# Altium PCB Switch_Matrix_32_2.PCBDOC (part 6 of 9)
Units mm, origin at the board's own origin, x right, y up, seen from the top; angles counter-clockwise.
Board outline 222.54 x 100 mm, 6 copper layers (L1, P2, L3, P4, L5, L6), stack 1.61 mm thick; 629 components, 583 nets, 2332 pads, 825 vias.
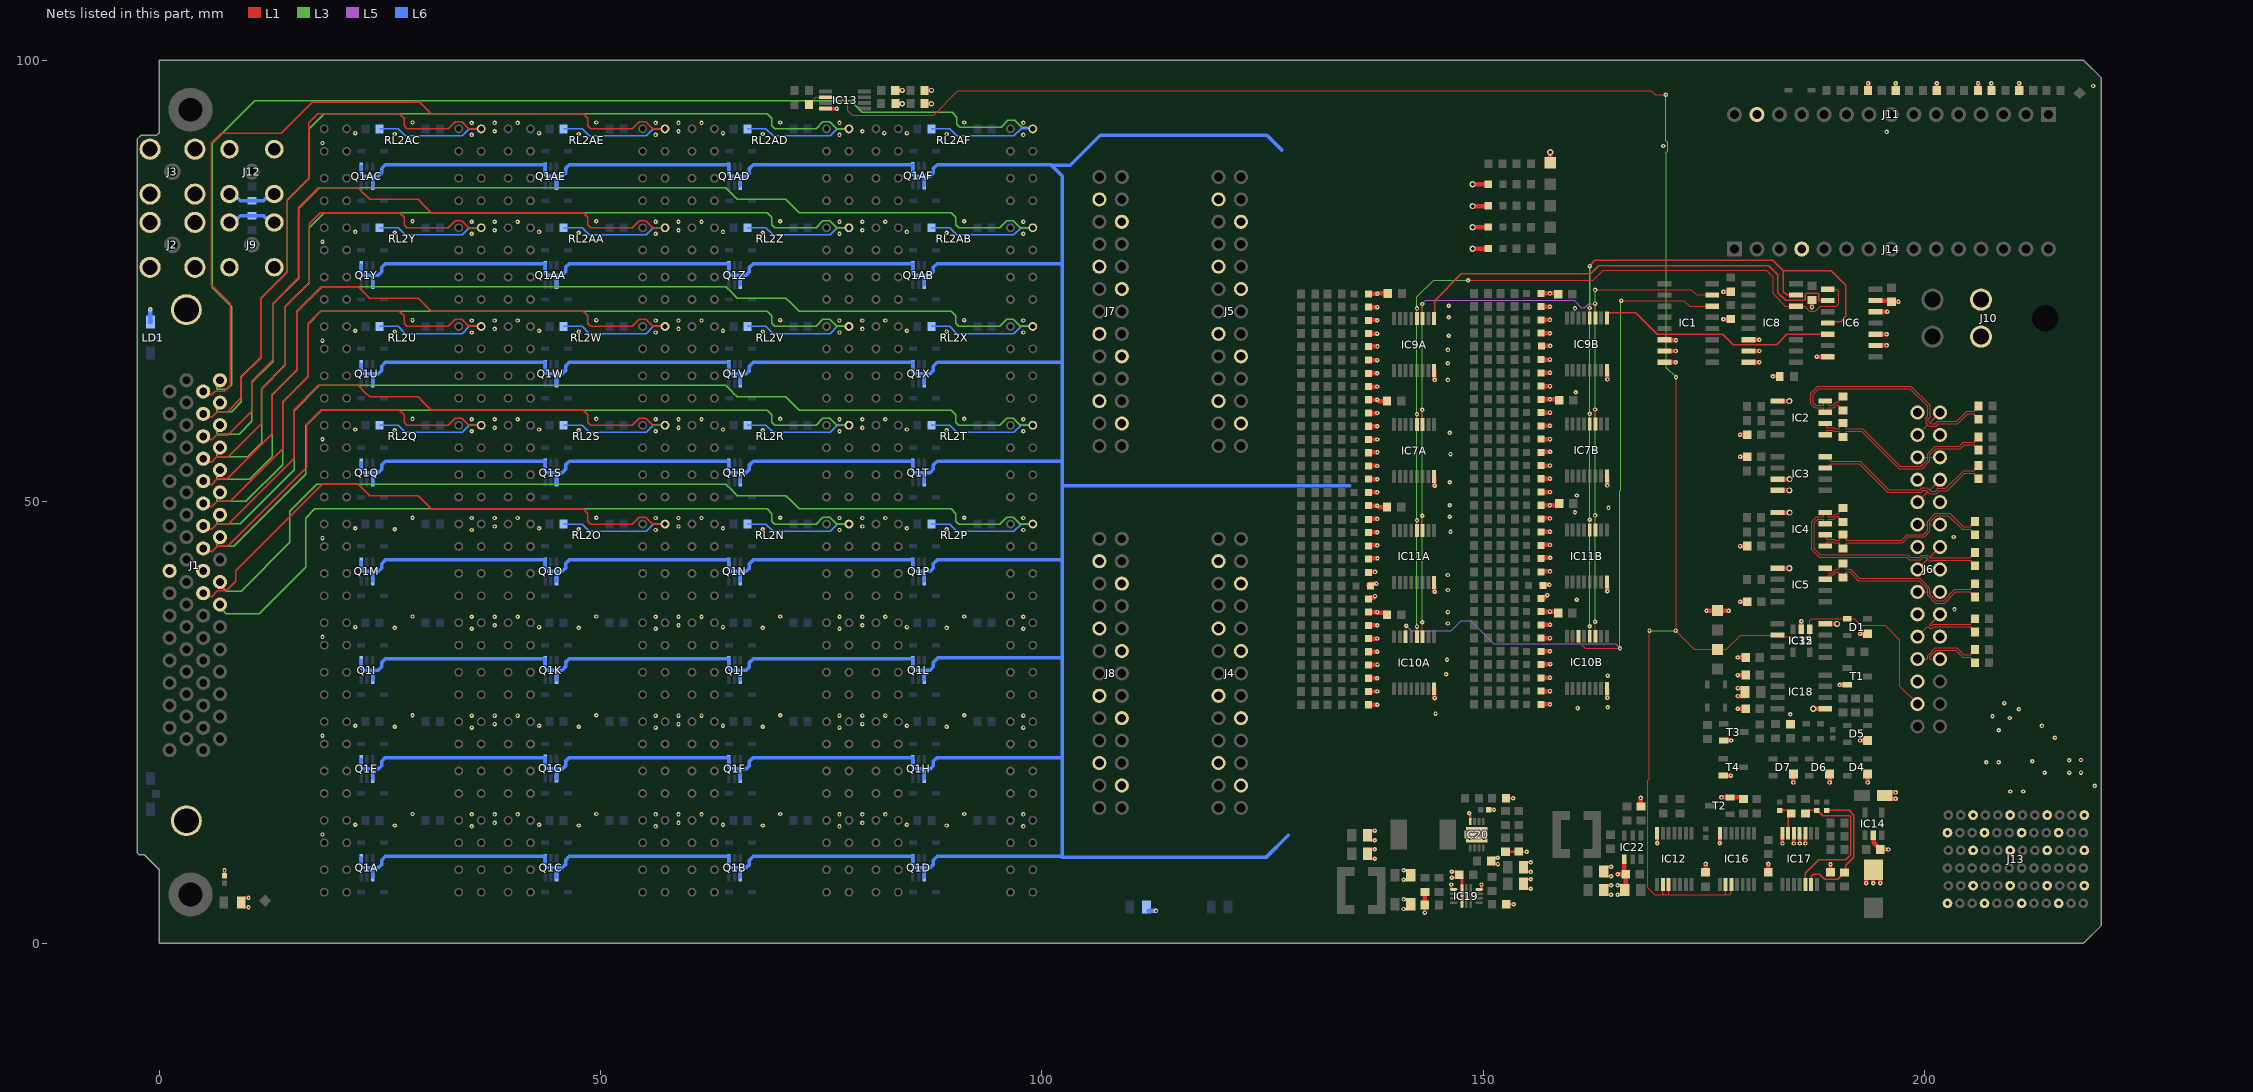
[diagram p9: the nets of this part, all layers, seen from the top]

## Via types
v1: diameter 0.5, hole 0.2, L1 to L6, tented both sides, 775 vias
v2: diameter 0.7, hole 0.4, L1 to L6, tented both sides, 41 vias
v3: diameter 0.5, hole 0.2, L1 to L6, 5 vias
v4: diameter 0.6, hole 0.3, L1 to L6, tented both sides, 4 vias

## Nets (pads, with @x,y where several pads share a name; then routed paths per layer and width w, separated by ;. In a path a pad name is that pad's centre, name@x,y a point inside that pad or via, vN(x,y) a via of type N, cw(c..) or ccw(c..) an arc to the next point about the centre after c; other vN are vias at no path point) (continued)
DAC_OUT_P14: J1.14 R98N.1 RL2N.5 | length 94
  L3 w0.152: J1.14@6.894,38.361 6.894,38.036 7.598,37.333 11.333,37.333 16.595,42.595 16.595,48.126 17.644,49.175 19.933,49.175 68.891,49.175 69.408,48.659 69.408,47.81 69.746,47.472 74.414,47.472 75.204,48.262 75.949,48.262 76.74,47.472 RL2N.5@78.146,47.472
  L6 w0.152: R98N.1@66.65,47.472 68.744,47.472 69.548,46.668 76.006,46.668 76.81,47.472 RL2N.5@78.146,47.472
DAC_OUT_P15: J1.15 R98O.1 RL2O.5 | length 73.6
  L1 w0.152: J1.15@4.989,39.631 5.381,39.631 5.767,39.245 5.929,39.245 6.582,39.898 7.581,39.898 8.689,41.006 8.689,42.207 18.462,51.981 22.529,51.981 23.226,51.284 23.334,51.176 23.829,50.681 29.329,50.681 29.926,50.084 30.034,49.976 30.835,49.175 48.055,49.175 48.572,48.659 48.572,47.81 48.91,47.472 53.578,47.472 54.368,48.262 55.113,48.262 55.904,47.472 RL2O.5@57.31,47.472
  L6 w0.152: R98O.1@45.814,47.472 47.908,47.472 48.712,46.668 55.17,46.668 55.974,47.472 RL2O.5@57.31,47.472
DAC_OUT_P16: J1.16 R98P.1 RL2P.5 | length 115
  L3 w0.152: J1.16@6.894,40.901 6.894,40.576 7.598,39.873 9.273,39.873 14.795,45.395 14.795,48.926 17.85,51.981 19.291,51.981 64.201,51.981 64.898,51.284 65.006,51.176 65.501,50.681 71.001,50.681 71.598,50.084 71.706,49.976 72.507,49.175 89.727,49.175 90.244,48.659 90.244,47.81 90.582,47.472 95.25,47.472 96.04,48.262 96.785,48.262 97.576,47.472 RL2P.5@98.982,47.472
  L6 w0.152: R98P.1@87.486,47.472 89.58,47.472 90.384,46.668 96.842,46.668 97.646,47.472 RL2P.5@98.982,47.472
DAC_OUT_P17: J1.19 R98Q.1 RL2Q.5 | length 55.1
  L1 w0.152: J1.19@4.989,44.711 5.381,44.711 5.767,44.325 5.929,44.325 6.582,44.978 7.779,44.978 16.695,53.894 16.695,58.726 18.336,60.367 27.219,60.367 27.736,59.851 27.736,59.002 28.074,58.664 32.742,58.664 33.532,59.454 34.277,59.454 35.068,58.664 RL2Q.5@36.474,58.664
  L6 w0.152: R98Q.1@24.978,58.664 27.072,58.664 27.876,57.86 34.334,57.86 35.138,58.664 RL2Q.5@36.474,58.664
DAC_OUT_P18: J1.20 R98R.1 RL2R.5 | length 96.4
  L3 w0.152: J1.20@6.894,45.981 6.894,45.59 6.509,45.204 6.509,45.042 6.598,44.953 8.453,44.953 16.595,53.095 16.595,58.626 18.336,60.367 20.827,60.367 68.891,60.367 69.408,59.851 69.408,59.002 69.746,58.664 74.414,58.664 75.204,59.454 75.949,59.454 76.74,58.664 RL2R.5@78.146,58.664
  L6 w0.152: R98R.1@66.65,58.664 68.744,58.664 69.548,57.86 76.006,57.86 76.81,58.664 RL2R.5@78.146,58.664
DAC_OUT_P19: J1.21 R98S.1 RL2S.5 | length 77.6
  L1 w0.152: J1.21@4.989,47.251 5.381,47.251 5.767,46.865 5.929,46.865 6.582,47.518 7.86,47.518 15.295,54.953 15.295,60.426 18.042,63.173 22.529,63.173 23.226,62.476 23.334,62.368 23.829,61.873 29.329,61.873 29.926,61.276 30.034,61.168 30.835,60.367 48.055,60.367 48.572,59.851 48.572,59.002 48.91,58.664 53.578,58.664 54.368,59.454 55.113,59.454 55.904,58.664 RL2S.5@57.31,58.664
  L6 w0.152: R98S.1@45.814,58.664 47.908,58.664 48.712,57.86 55.17,57.86 55.974,58.664 RL2S.5@57.31,58.664
DAC_OUT_P20: J1.22 R98T.1 RL2T.5 | length 119.2
  L3 w0.152: J1.22@6.894,48.521 6.894,48.13 6.509,47.744 6.509,47.582 6.598,47.493 9.193,47.493 15.295,53.595 15.295,60.326 18.142,63.173 19.543,63.173 64.201,63.173 64.898,62.476 65.006,62.368 65.501,61.873 71.001,61.873 71.598,61.276 71.706,61.168 72.507,60.367 89.727,60.367 90.244,59.851 90.244,59.002 90.582,58.664 95.25,58.664 96.04,59.454 96.785,59.454 97.576,58.664 RL2T.5@98.982,58.664
  L6 w0.152: R98T.1@87.486,58.664 89.58,58.664 90.384,57.86 96.842,57.86 97.646,58.664 RL2T.5@98.982,58.664
DAC_OUT_P21: J1.23 R98U.1 RL2U.5 | length 61.5
  L1 w0.152: J1.23@4.989,49.791 5.381,49.791 5.767,49.405 5.929,49.405 6.582,50.058 8.055,50.058 14.021,56.025 14.021,61.321 16.882,64.182 16.882,70.214 18.228,71.559 27.219,71.559 27.736,71.043 27.736,70.194 28.074,69.856 32.742,69.856 33.532,70.646 34.277,70.646 35.068,69.856 RL2U.5@36.474,69.856
  L6 w0.152: R98U.1@24.978,69.856 27.072,69.856 27.876,69.052 34.334,69.052 35.138,69.856 RL2U.5@36.474,69.856
DAC_OUT_P22: J1.24 R98V.1 RL2V.5 | length 103.3
  L3 w0.152: J1.24@6.894,51.061 6.894,50.67 6.509,50.284 6.509,50.122 6.598,50.033 9.833,50.033 13.995,54.195 13.995,61.295 16.895,64.195 16.895,70.126 18.328,71.559 18.924,71.559 68.891,71.559 69.408,71.043 69.408,70.194 69.746,69.856 74.414,69.856 75.204,70.646 75.949,70.646 76.74,69.856 RL2V.5@78.146,69.856
  L6 w0.152: R98V.1@66.65,69.856 68.744,69.856 69.548,69.052 76.006,69.052 76.81,69.856 RL2V.5@78.146,69.856
DAC_OUT_P23: J1.25 R98W.1 RL2W.5 | length 83.4
  L1 w0.152: J1.25@4.989,52.331 5.381,52.331 5.767,51.945 5.929,51.945 6.582,52.598 7.688,52.598 12.815,57.725 12.815,62.115 15.595,64.895 15.595,71.562 18.398,74.365 22.529,74.365 23.226,73.668 23.334,73.56 23.829,73.065 29.329,73.065 29.926,72.468 30.034,72.36 30.835,71.559 48.055,71.559 48.572,71.043 48.572,70.194 48.91,69.856 53.578,69.856 54.368,70.646 55.113,70.646 55.904,69.856 RL2W.5@57.31,69.856
  L6 w0.152: R98W.1@45.814,69.856 47.908,69.856 48.712,69.052 55.17,69.052 55.974,69.856 RL2W.5@57.31,69.856
DAC_OUT_P24: J1.26 R98X.1 RL2X.5 | length 125.8
  L3 w0.152: J1.26@6.894,53.601 6.894,53.21 6.509,52.824 6.509,52.662 6.598,52.573 10.273,52.573 12.795,55.095 12.795,62.095 15.595,64.895 15.595,71.526 18.434,74.365 19.268,74.365 64.201,74.365 64.898,73.668 65.006,73.56 65.501,73.065 71.001,73.065 71.598,72.468 71.706,72.36 72.507,71.559 89.727,71.559 90.244,71.043 90.244,70.194 90.582,69.856 95.25,69.856 96.04,70.646 96.785,70.646 97.576,69.856 RL2X.5@98.982,69.856
  L6 w0.152: R98X.1@87.486,69.856 89.58,69.856 90.384,69.052 96.842,69.052 97.646,69.856 RL2X.5@98.982,69.856
DAC_OUT_P25: J1.27 R98Y.1 RL2Y.5 | length 67.5
  L1 w0.152: J1.27@4.989,54.871 5.381,54.871 5.767,54.485 5.929,54.485 6.543,55.1 7.808,55.1 11.569,58.861 11.569,62.769 14.295,65.495 14.295,72.135 16.972,74.812 16.972,81.503 18.22,82.751 27.219,82.751 27.736,82.235 27.736,81.386 28.074,81.048 32.742,81.048 33.532,81.838 34.277,81.838 35.068,81.048 RL2Y.5@36.474,81.048
  L6 w0.152: R98Y.1@24.978,81.048 27.072,81.048 27.876,80.244 34.334,80.244 35.138,81.048 RL2Y.5@36.474,81.048
DAC_OUT_P26: J1.28 R98Z.1 RL2Z.5 | length 109.3
  L3 w0.152: J1.28@6.894,56.141 6.894,55.75 6.509,55.364 6.509,55.202 6.598,55.113 10.013,55.113 11.595,56.695 11.595,62.795 14.295,65.495 14.295,72.095 16.984,74.784 16.984,81.015 18.72,82.751 20.1,82.751 68.891,82.751 69.408,82.235 69.408,81.386 69.746,81.048 74.414,81.048 75.204,81.838 75.949,81.838 76.74,81.048 RL2Z.5@78.146,81.048
  L6 w0.152: R98Z.1@66.65,81.048 68.744,81.048 69.548,80.244 76.006,80.244 76.81,81.048 RL2Z.5@78.146,81.048
DAC_OUT_P27: J1.29 R98AA.1 RL2AA.5 | length 89.9
  L1 w0.152: J1.29@4.989,57.411 5.381,57.411 5.767,57.025 5.929,57.025 6.448,57.545 7.75,57.545 10.458,60.253 10.458,63.658 12.895,66.095 12.895,72.5 15.758,75.363 15.758,83.289 18.026,85.557 22.529,85.557 23.226,84.86 23.334,84.752 23.829,84.257 29.329,84.257 29.926,83.66 30.034,83.552 30.835,82.751 48.055,82.751 48.572,82.235 48.572,81.386 48.91,81.048 53.578,81.048 54.368,81.838 55.113,81.838 55.904,81.048 RL2AA.5@57.31,81.048
  L6 w0.152: R98AA.1@45.814,81.048 47.908,81.048 48.712,80.244 55.17,80.244 55.974,81.048 RL2AA.5@57.31,81.048
DAC_OUT_P28: J1.30 R98AB.1 RL2AB.5 | length 131.4
  L3 w0.152: J1.30@6.894,58.681 6.894,58.29 6.509,57.904 6.509,57.742 6.598,57.653 9.053,57.653 10.5,59.1 10.5,63.531 12.9,65.931 12.9,72.431 15.8,75.331 15.8,83.231 18.126,85.557 20.591,85.557 64.201,85.557 64.898,84.86 65.006,84.752 65.501,84.257 71.001,84.257 71.598,83.66 71.706,83.552 72.507,82.751 89.727,82.751 90.244,82.235 90.244,81.386 90.582,81.048 95.25,81.048 96.04,81.838 96.785,81.838 97.576,81.048 RL2AB.5@98.982,81.048
  L6 w0.152: R98AB.1@87.486,81.048 89.58,81.048 90.384,80.244 96.842,80.244 97.646,81.048 RL2AB.5@98.982,81.048
DAC_OUT_P29: J1.31 R98AC.1 RL2AC.5 | length 73.7
  L1 w0.152: J1.31@4.989,59.951 5.381,59.951 5.767,59.565 5.929,59.565 6.582,60.218 7.771,60.218 9.261,61.708 9.261,64.1 11.495,66.334 11.495,72.995 14.495,75.995 14.495,84.195 16.94,86.64 16.94,92.912 17.972,93.943 27.219,93.943 27.736,93.427 27.736,92.578 28.074,92.24 32.742,92.24 33.532,93.03 34.277,93.03 35.068,92.24 RL2AC.5@36.474,92.24
  L6 w0.152: R98AC.1@24.978,92.24 27.072,92.24 27.876,91.436 34.334,91.436 35.138,92.24 RL2AC.5@36.474,92.24
DAC_OUT_P30: J1.32 R98AD.1 RL2AD.5 | length 114.4
  L3 w0.152: J1.32@6.894,61.221 6.894,60.83 6.509,60.444 6.509,60.282 6.598,60.193 8.193,60.193 9.3,61.3 9.3,64.131 11.5,66.331 11.5,73.031 14.5,76.031 14.5,84.131 17,86.631 17,92.235 18.708,93.943 68.891,93.943 69.408,93.427 69.408,92.578 69.746,92.24 74.414,92.24 75.204,93.03 75.949,93.03 76.74,92.24 RL2AD.5@78.146,92.24
  L6 w0.152: R98AD.1@66.65,92.24 68.744,92.24 69.548,91.436 76.006,91.436 76.81,92.24 RL2AD.5@78.146,92.24
DAC_OUT_P31: J1.33 R98AE.1 RL2AE.5 | length 99.9
  L1 w0.152: J1.33@4.989,62.491 5.381,62.491 5.767,62.105 5.929,62.105 6.353,62.529 7.382,62.529 8.039,63.185 8.039,72.43 6.692,73.777 5.895,74.574 5.895,90.626 7.009,91.74 13.845,91.74 17.35,95.245 29.533,95.245 29.926,94.852 30.034,94.744 30.835,93.943 48.055,93.943 48.572,93.427 48.572,92.578 48.91,92.24 53.578,92.24 54.368,93.03 55.113,93.03 55.904,92.24 RL2AE.5@57.31,92.24
  L6 w0.152: R98AE.1@45.814,92.24 47.908,92.24 48.712,91.436 55.17,91.436 55.974,92.24 RL2AE.5@57.31,92.24
DAC_OUT_P32: J1.34 R98AF.1 RL2AF.5 | length 141
  L3 w0.152: J1.34@6.894,63.761 6.894,63.37 6.509,62.984 6.509,62.822 6.598,62.733 7.66,62.733 8.194,63.267 8.194,72.106 5.995,74.305 5.995,90.626 10.684,95.316 10.774,95.405 78.326,95.405 79.627,94.103 89.851,94.103 90.368,93.587 90.368,92.738 90.706,92.4 95.374,92.4 96.164,93.19 96.909,93.19 97.7,92.4 RL2AF.5@99.106,92.4
  L6 w0.152: R98AF.1@87.486,92.24 89.58,92.24 90.384,91.436 96.842,91.436 97.646,92.24 RL2AF.5@98.982,92.24
DESER-CSnA: IC6.1 IC7A.12 IC8.14 IC9A.12 IC10A.12 IC11A.12 | length 97.1
  L1 w0.127: IC10A.12@142.5,34.7 v1(142.5,35.85) ; IC11A.12@142.5,46.75 v1(142.5,47.9) ; IC7A.12@142.5,58.75 v1(142.5,59.9) ; IC9A.12@142.5,70.75 v1(142.5,71.9) ; v1(148.3,75.1) 162.471,75.1 163.603,76.232 166.1,76.232 182.068,76.232 182.852,75.448 182.852,73.548 184.245,72.155 IC8.14@185.45,72.155 186.445,72.155 187.017,71.583 187.604,71.583 188.178,72.157 189.982,72.157 190.278,72.453 190.278,73.83 190.048,74.06 IC6.1@189.05,74.06
  L3 w0.127: v1(142.5,35.85) v1(142.5,59.9) v1(142.5,71.9) 142.5,73.2 144.4,75.1 v1(148.3,75.1)
DESER-CSnB: IC6.4 IC7B.12 IC8.15 IC9B.12 IC10B.12 IC11B.12 | length 85.6
  L1 w0.127: IC10B.12@162.075,34.75 v1(162.075,35.9) ; IC11B.12@162.075,46.8 v1(162.075,47.95) ; IC7B.12@162.075,58.8 v1(162.075,59.95) ; IC9B.12@162.075,70.8 v1(162.075,71.95)
  L1 w0.152: v1@162.203,76.7 162.2,76.697 162.162,76.735 162.162,76.862 162.63,77.33 166.442,77.33 182.833,77.33 184,76.162 ; IC8.15@185.475,73.4 IC8.15@185.45,73.425 184.375,73.425 184,73.8 184,76.162 ; IC6.4@189,70.3 189.1,70.4 190.5,70.4 191.1,71 191.1,74.5 189.438,76.162 184,76.162
  L3 w0.127: v1(162.075,35.9) v1(162.075,59.95) v1(162.075,71.95)
  L3 w0.152: v1@162.075,72.142 v1(162.075,76.697)
DESER-MISOA: IC6.2 IC9A.9 | length 52.4
  L1 w0.127: IC9A.9@144.45,70.75 IC9A.9@144.5,70.8
  L1 w0.152: IC9A.9@144.5,70.8 144.5,72.773 147.527,75.8 162.171,75.8 163.101,76.73 166.319,76.73 182.37,76.73 183.4,75.7 183.4,73.7 184.3,72.8 186.4,72.8 186.5,72.9 186.5,73.5 186.633,73.633 187.845,73.633 188,73.478 188,72.9 188.11,72.79 IC6.2@189.05,72.79 IC6.2@189.06,72.8
DESER-MISOB: IC6.5 IC9B.9 | length 27.1
  L1 w0.127: IC9B.9@164.025,70.8 IC9B.9@164.075,70.85
  L1 w0.152: IC9B.9@163.993,71.395 167.305,71.395 169.7,69 177.122,69 178.322,67.8 183.24,67.8 184.42,68.98 IC6.5@189.05,68.98
DESER-MOSIA: IC1.14 IC10A.14 IC10B.14 | length 83.1
  L1 w0.127: IC10A.14@141.2,34.7 141.29,34.79 v1(141.29,35.95) ; IC10B.14@160.775,34.75 160.775,34.25 161.01,34.016 161.01,33.946 161.556,33.4 v1(165.5,33.4) ; v1(165.653,72.791) 172.75,72.791 173.387,72.155 IC1.14@175.95,72.155
  L5 w0.127: v1(141.29,35.95) 141.84,35.4 146.4,35.4 147.5,36.5 148.6,36.5 151.219,33.881 164.996,33.881 165.477,33.4 v1(165.5,33.4)
  L3 w0.127: v1(165.5,33.4) 165.5,51.221 165.598,51.319 165.598,72.736 v1(165.653,72.791)
DESER-SCKA: IC1.15 IC7A.11 IC7B.11 IC9A.11 IC9B.11 IC10A.11 IC10B.11 IC11A.11 IC11B.11 | length 120.8
  L1 w0.127: v1(143.1,36.35) 143.1,34.75 IC10A.11@143.15,34.7 ; v1(143.1,48.4) 143.1,46.8 IC11A.11@143.15,46.75 ; v1(143.1,60.4) 143.1,58.8 IC7A.11@143.15,58.75 ; v1(143.1,72.4) 143.1,70.8 IC9A.11@143.15,70.75 ; v1@162.653,74 173.6,74 174.175,73.425 IC1.15@175.95,73.425 ; v1(162.675,36.4) 162.675,34.8 IC10B.11@162.725,34.75 ; v1(162.675,48.45) 162.675,46.85 IC11B.11@162.725,46.8 ; v1(162.675,60.45) 162.675,58.85 IC7B.11@162.725,58.8 ; v1(162.675,72.45) 162.675,70.85 IC9B.11@162.725,70.8
  L5 w0.127: v1(143.1,72.4) 143.5,72.8 160.3,72.8 161.1,72 161.5,72 161.95,72.45 v1(162.675,72.45)
  L3 w0.127: v1(143.1,36.35) v1(143.1,60.4) v1(143.1,72.4) ; v1@162.638,72.488 v1(162.675,72.45) v1(162.675,60.45) v1(162.675,36.4) ; v1@162.667,73.984 v1@162.683,74 ; v1@162.675,72.488 v1@162.675,73.984
  other v1: 162.675,74
EEM0_0_N: IC2.4 J6.3 R9.2 R161.2 | length 30.3
  L1 w0.127: R9.2@190.75,61.929 190.7,61.929 190.313,61.543 190.313,61.343 190.239,61.269 189.96,61.269 189.6,60.91 189.169,60.91 189.094,60.984 189.094,61.169 188.858,61.405 IC2.4@188.751,61.405 188.602,61.256 188.602,60.984 188.528,60.91 187.69,60.91 187.4,61.2 187.4,62.2 188.021,62.821 198.345,62.821 200.344,60.822 200.344,59.686 200.172,59.515 200.172,58.95 200.329,58.794 200.329,58.689 ; J6.3@199.21,57.57 200.329,58.689 ; R161.2@206.1,59.35 205.713,59.736 205.713,59.886 205.639,59.96 204.889,59.96 203.769,58.84 201.619,58.84 201.312,58.532 200.59,58.532 200.434,58.689 200.329,58.689
EEM0_0_P: IC2.3 J6.2 R9.1 R145.2 | length 31.3
  L1 w0.127: R9.1@190.75,60.329 190.7,60.329 190.313,60.716 190.313,60.915 190.239,60.99 190.075,60.99 189.716,60.63 189.169,60.63 189.094,60.556 189.094,60.371 188.858,60.135 IC2.3@188.751,60.135 188.602,60.284 188.602,60.556 188.528,60.63 187.575,60.63 187.121,61.084 187.121,62.316 187.905,63.1 198.461,63.1 200.624,60.937 200.624,59.571 200.452,59.399 200.452,59.066 200.526,58.991 200.631,58.991 ; J6.2@201.75,60.11 200.631,58.991 ; R145.2@206.1,60.85 205.713,60.463 205.713,60.314 205.639,60.24 204.774,60.24 203.653,59.119 201.504,59.119 201.196,58.812 200.706,58.812 200.631,58.886 200.631,58.991
EEM0_1_N: IC2.1 J6.6 R7.1 R162.2 | length 23.2
  L1 w0.127: IC2.1@188.751,57.595 188.9,57.744 188.9,58.016 188.974,58.09 189.623,58.09 189.724,57.99 190.325,57.99 190.4,57.915 190.4,57.679 R7.1@190.75,57.329 ; R7.1@190.95,57.329 191.099,57.478 191.099,57.915 191.173,57.99 192.889,57.99 197.118,53.76 199.736,53.76 200.62,54.644 200.62,54.956 200.694,55.03 ; J6.6@201.75,55.03 200.694,55.03 ; R162.2@206.1,55.85 205.713,56.237 205.713,56.386 205.639,56.46 204.496,56.46 204.056,56.021 201.34,56.021 200.62,55.3 200.62,55.104 200.694,55.03
EEM0_1_P: IC2.2 J6.5 R7.2 R146.2 | length 23.2
  L1 w0.127: IC2.2@188.751,58.865 188.9,58.716 188.9,58.444 188.974,58.37 189.739,58.37 189.84,58.269 190.325,58.269 190.4,58.343 190.4,58.579 R7.2@190.75,58.929 ; R7.2@190.95,58.929 191.099,58.781 191.099,58.343 191.173,58.269 193.004,58.269 197.234,54.039 199.62,54.039 200.34,54.76 200.34,54.956 200.266,55.03 ; J6.5@199.21,55.03 200.266,55.03 ; R146.2@206.1,57.35 205.713,56.963 205.713,56.814 205.639,56.74 204.38,56.74 203.94,56.3 201.224,56.3 200.34,55.416 200.34,55.104 200.266,55.03
EEM0_2_N: IC3.7 J6.9 R163.2 | length 22.2
  L1 w0.127: IC3.7@188.751,53.825 189.049,53.825 189.285,54.061 189.285,54.245 189.36,54.32 192.615,54.32 195.849,51.087 199.602,51.087 199.817,51.301 200.202,51.301 200.329,51.174 200.329,51.069 ; J6.9@199.21,49.95 200.329,51.069 ; R163.2@206.1,52.6 205.713,52.987 205.713,53.136 205.639,53.21 204.54,53.21 202.55,51.22 201.619,51.22 201.312,50.912 200.59,50.912 200.434,51.069 200.329,51.069
EEM0_2_P: IC3.8 J6.8 R147.2 | length 22.2
  L1 w0.127: IC3.8@188.751,55.095 189.049,55.095 189.285,54.858 189.285,54.674 189.36,54.599 192.731,54.599 195.965,51.366 199.487,51.366 199.701,51.58 200.317,51.58 200.526,51.371 200.631,51.371 ; J6.8@201.75,52.49 200.631,51.371 ; R147.2@206.1,54.1 205.713,53.713 205.713,53.564 205.639,53.49 204.425,53.49 202.435,51.499 201.504,51.499 201.196,51.192 200.706,51.192 200.631,51.266 200.631,51.371
EEM0_3_N: IC4.1 J6.12 R12.1 R164.2 | length 21.6
  L1 w0.127: IC4.1@188.751,44.975 188.9,45.123 188.9,45.396 188.974,45.47 189.624,45.47 189.724,45.369 190.326,45.369 190.4,45.295 R12.1@190.4,45.059 ; R12.1@190.95,44.709 191.099,44.858 191.099,45.295 191.173,45.369 197.541,45.369 198.178,46.006 199.999,46.006 200.62,46.627 200.62,47.336 200.694,47.41 ; J6.12@201.75,47.41 200.694,47.41 ; R164.2@205.7,46.25 205.313,46.637 205.313,46.786 205.239,46.86 204.256,46.86 202.716,48.401 201.34,48.401 200.62,47.68 200.62,47.484 200.694,47.41
EEM0_3_P: IC4.2 J6.11 R12.2 R148.2 | length 21.6
  L1 w0.127: IC4.2@188.751,46.245 188.9,46.096 188.9,45.824 188.974,45.749 189.739,45.749 189.84,45.649 190.326,45.649 190.4,45.723 R12.2@190.4,45.959 ; R12.2@190.95,46.309 191.099,46.16 191.099,45.723 191.173,45.649 197.425,45.649 198.062,46.285 199.883,46.285 200.34,46.742 200.34,47.336 200.266,47.41 ; J6.11@199.21,47.41 200.266,47.41 ; R148.2@205.7,47.75 205.313,47.363 205.313,47.214 205.239,47.14 204.372,47.14 202.832,48.68 201.224,48.68 200.34,47.796 200.34,47.484 200.266,47.41
EEM0_4_N: IC4.4 J6.15 R14.2 R167.2 | length 29.4
  L1 w0.127: R14.2@190.75,49.309 190.7,49.309 190.313,48.923 190.313,48.723 190.239,48.649 189.96,48.649 189.6,48.289 189.169,48.289 189.094,48.364 189.094,48.548 188.858,48.785 IC4.4@188.751,48.785 188.602,48.636 188.602,48.364 188.528,48.289 187.786,48.289 187.221,47.724 187.221,44.543 188.047,43.717 197.983,43.717 198.249,43.451 199.587,43.451 199.817,43.681 200.202,43.681 200.329,43.554 200.329,43.449 ; J6.15@199.21,42.33 200.329,43.449 ; R167.2@205.7,42.75 205.313,43.137 205.313,43.286 205.239,43.36 200.995,43.36 200.927,43.292 200.59,43.292 200.434,43.449 200.329,43.449
EEM0_4_P: IC4.3 J6.14 R14.1 R149.2 | length 28.4
  L1 w0.127: R14.1@190.75,47.709 190.7,47.709 190.313,48.096 190.313,48.295 190.239,48.369 190.075,48.369 189.716,48.01 189.169,48.01 189.094,47.936 189.094,47.751 188.858,47.515 IC4.3@188.751,47.515 188.602,47.663 188.602,47.936 188.528,48.01 187.902,48.01 187.5,47.608 187.5,44.659 188.163,43.996 198.099,43.996 198.365,43.73 199.471,43.73 199.701,43.96 200.317,43.96 200.526,43.751 200.631,43.751 ; J6.14@201.75,44.87 200.631,43.751 ; R149.2@205.7,44.25 205.313,43.863 205.313,43.714 205.239,43.64 200.879,43.64 200.811,43.572 200.706,43.572 200.631,43.646 200.631,43.751
EEM0_5_N: IC5.4 J6.18 R88.2 R168.2 | length 21.9
  L1 w0.127: IC5.4@188.858,42.475 189.094,42.238 189.094,42.054 189.169,41.979 189.6,41.979 189.96,42.339 190.239,42.339 190.314,42.413 190.314,42.613 190.7,42.999 R88.2@190.75,42.999 ; R88.2@190.95,42.999 191.099,42.85 191.099,42.413 191.173,42.339 191.625,42.339 191.789,42.175 192.624,41.339 199.456,41.339 200.62,40.176 200.62,39.864 200.694,39.79 ; J6.18@201.75,39.79 200.694,39.79 ; R168.2@205.7,40.7 205.313,40.313 205.313,40.164 205.239,40.09 203.45,40.09 202.16,38.799 201.34,38.799 200.62,39.52 200.62,39.716 200.694,39.79
EEM0_5_P: IC5.3 J6.17 R88.1 R150.2 | length 21.8
  L1 w0.127: IC5.3@188.858,41.205 189.094,41.441 189.094,41.626 189.169,41.7 189.716,41.7 190.075,42.059 190.239,42.059 190.314,41.985 190.314,41.786 190.7,41.399 R88.1@190.75,41.399 ; R88.1@190.95,41.399 191.099,41.548 191.099,41.985 191.173,42.059 191.51,42.059 192.509,41.06 199.341,41.06 200.34,40.06 200.34,39.864 200.266,39.79 ; J6.17@199.21,39.79 200.266,39.79 ; R150.2@205.7,39.2 205.09,39.81 203.566,39.81 202.276,38.52 201.224,38.52 200.34,39.404 200.34,39.716 200.266,39.79
EEM0_6_N: J6.21 R169.2 | length 7.4
  L1 w0.127: J6.21@199.21,34.71 200.329,35.829 200.434,35.829 200.59,35.672 200.927,35.672 201.115,35.86 205.239,35.86 205.313,35.786 205.313,35.637 R169.2@205.7,35.25
EEM0_6_P: J6.20 R97.2 | length 7.2
  L1 w0.127: J6.20@201.75,37.25 200.631,36.131 200.631,36.026 200.706,35.952 200.811,35.952 200.999,36.14 205.239,36.14 205.313,36.214 205.313,36.363 R97.2@205.7,36.75
EEM0_7_N: J6.24 R170.2 | length 7.4
  L1 w0.127: J6.24@201.75,32.17 200.694,32.17 200.62,32.244 200.62,32.44 201.34,33.161 203.524,33.161 204.324,32.36 205.239,32.36 205.313,32.286 205.313,32.137 R170.2@205.7,31.75
EEM0_7_P: J6.23 R152.2 | length 7.9
  L1 w0.127: J6.23@199.21,32.17 200.266,32.17 200.34,32.244 200.34,32.556 201.224,33.44 203.64,33.44 204.44,32.64 205.239,32.64 205.313,32.714 205.313,32.863 R152.2@205.7,33.25
GA0: IC17.6 R111.2 R130.1 | length 3.8
  L1 w0.152: R130.1@183.6,15.03 184.57,15.03 R111.2@184.9,14.7 184.558,14.358 IC17.6@184.558,12.431
GA1: IC17.12 R109.2 R131.1 | length 17.2
  L1 w0.152: R109.2@186.5,14.7 186.83,15.03 R131.1@187.8,15.03 187.82,15.03 188.451,14.399 191.524,14.399 191.654,14.27 191.654,9.979 191.086,9.41 188.01,9.41 186.508,7.908 IC17.12@186.508,6.631
GA2: IC17.13 R106.2 R136.1 | length 15.7
  L1 w0.152: IC17.13@187.158,6.631 187.158,7.558 187.4,7.8 188.1,7.8 188.7,7.2 190.15,7.2 190.526,7.576 190.526,7.626 190.9,8 R106.2@190.95,8 191.089,8.139 191.089,8.813 192.003,9.727 192.003,14.487 191.461,15.03 R136.1@188.9,15.03
GND: C1.1 C2.1 C3.1 C4.1 C5.1 C6.1 C7.1 C8.1 C9.1 C10.1 C11.1 C12.1 C13.1 C14.1 C15.1 C16.1 C17.1 C18A.1 C18B.1 C19A.1 C19B.1 C20A.1 C20B.1 C21A.1 C21B.1 C22.1 C23.2 C24.1 C25.1 C26.1 C27.1 C28.1 C29.1 C30.1 C31.1 C32.1 C33.1 C38.1 C40.1 C47.1 C58.1 C93.1 C110.1 C121.1 C123.1 C212.2 D1.1 D4.1 D5.1 D6.1 D7.1 D10.2 IC1.6 IC1.7 IC1.8 IC2.5 IC3.3 IC3.4 IC4.5 IC5.5 IC6.7 IC6.9 IC6.10 IC6.12 IC6.13 IC7A.8 IC7B.8 IC8.6 IC8.7 IC8.8 IC9A.8 IC9B.8 IC10A.8 IC10B.8 IC11A.8 IC11B.8 IC12.7 IC13.4 IC14.2 IC15.4 IC16.7 IC17.3 IC17.4 IC17.5 IC17.7 IC18.1 IC19.3 IC19.4 IC19.11 IC20.8 IC20.9 IC22.1 IC32.2 J1.17 J1.51 J1.69 J1.70 J2.2 J3.2 J4.3 J4.6 J4.9 J4.12 J4.15 J4.18 J4.21 J4.24 J5.3 J5.6 J5.9 J5.12 J5.15 J5.18 J5.21 J5.24 J6.1 J6.4 J6.7 J6.10 J6.13 J6.16 J6.19 J6.22 J6.25 J7.3 J7.6 J7.9 J7.12 J7.15 J7.18 J7.21 J7.24 J8.3 J8.6 J8.9 J8.12 J8.15 J8.18 J8.21 J8.24 J9.2 J10.1 J10.2 J11.14 J12.2 J13.A2 J13.A4 J13.A6 J13.C1 J13.C5 J13.D2 J13.D4 J13.D6 J13.F1 J13.F5 J13.G2 J13.G4 J13.G6 J13.I1 J13.I5 J13.J2 J13.J4 J13.J6 J13.L1 J13.L5 J14.4 LD1.1 LD2A.1 LD2B.1 LD3A.1 LD3B.1 LD4.1 LD5A.1 LD5B.1 LD6A.1 LD6B.1 LD7A.1 LD7B.1 LD8A.1 LD8B.1 LD9A.1 LD9B.1 LD11.1 LD12A.1 LD12B.1 LD13A.1 LD13B.1 LD14A.1 LD14B.1 LD15A.1 LD15B.1 LD16A.1 LD16B.1 LD17A.1 LD17B.1 LD18A.1 LD18B.1 LD19A.1 LD19B.1 LD20A.1 LD20B.1 LD21A.1 LD21B.1 LD22A.1 LD22B.1 LD23A.1 LD23B.1 LD24A.1 LD24B.1 LD25A.1 LD25B.1 LD26A.1 LD26B.1 LD27A.1 LD27B.1 LD28A.1 LD28B.1 LD29A.1 LD29B.1 LD30A.1 LD30B.1 LD31A.1 LD31B.1 LD32A.1 LD32B.1 LD33A.1 LD33B.1 LD34A.1 LD34B.1 LD35A.1 LD35B.1 LD36A.1 LD36B.1 LD37.1 LD38.1 Q1A.1 Q1A.4 Q1AA.1 Q1AA.4 Q1AB.1 Q1AB.4 Q1AC.1 Q1AC.4 Q1AD.1 Q1AD.4 Q1AE.1 Q1AE.4 Q1AF.1 Q1AF.4 Q1B.1 Q1B.4 Q1C.1 Q1C.4 Q1D.1 Q1D.4 Q1E.1 Q1E.4 Q1F.1 Q1F.4 Q1G.1 Q1G.4 Q1H.1 Q1H.4 Q1I.1 Q1I.4 Q1J.1 Q1J.4 Q1K.1 Q1K.4 Q1L.1 Q1L.4 Q1M.1 Q1M.4 Q1N.1 Q1N.4 Q1O.1 Q1O.4 Q1P.1 Q1P.4 Q1Q.1 Q1Q.4 Q1R.1 Q1R.4 Q1S.1 Q1S.4 Q1T.1 Q1T.4 Q1U.1 Q1U.4 Q1V.1 Q1V.4 Q1W.1 Q1W.4 Q1X.1 Q1X.4 Q1Y.1 Q1Y.4 Q1Z.1 Q1Z.4 R56.1 R69.1 R70.1 R71.1 R90.1 R91.1 R92.1 R94.1 R95.1 R96.1 R100.1 R104.1 R117.1 R119.2 R122.1 R124.1 R126.2 T1.2 T2.2 T3.2 T4.2 TP16.1 TP17.1 | length 1099
  L1 w0.3: C212.2@7.4,7.65 v1@7.4,8.199 ; R126.2@9.531,4.06 v1@10.08,4.06 ; R126.2@9.531,5.14 v1@10.08,5.14 ; C17.1@137.131,9.56 v1@137.68,9.56 ; C17.1@137.131,10.64 v1@137.68,10.64 ; C16.1@137.131,11.66 v1@137.68,11.66 ; C16.1@137.131,12.74 v1@137.68,12.74 ; v1@141.02,3.86 C13.1@141.569,3.86 ; v1@141.02,4.94 C13.1@141.569,4.94 ; v1@141.02,7.16 C14.1@141.569,7.16 ; v1@141.02,8.24 C14.1@141.569,8.24 ; v1(143.4,3.451) C11.1@143.4,4 ; IC19.4@146.37,6.08 v1(146.37,6.629) ; v1(146.432,7.386) C29.1@146.981,7.386 ; v1(146.432,8.084) C29.1@146.981,8.084 ; IC19.3@147.592,5.325 C29.1@147.592,7.421 ; IC20.8@148.52,13.849 148.52,14.398 ; IC19.11@149.814,6.08 v1(149.814,6.629) ; C33.1@150.64,15.095 v1@151.189,15.095 ; C31.1@151.106,9.656 v1(151.654,9.656) ; C31.1@151.135,8.949 v1(151.684,8.949) ; C32.1@152.53,10.35 R124.1@154.03,10.35 ; R122.1@152.8,16.4 v1@153.349,16.4 ; C30.1@152.9,4.4 v1(153.449,4.4) ; R124.1@154.33,10.35 v1@154.878,10.35 ; C12.1@154.806,6.16 v1@155.355,6.16 ; C12.1@154.806,7.24 v1@155.355,7.24 ; C15.1@154.806,8.06 v1@155.355,8.06 ; C15.1@154.806,9.14 v1@155.355,9.14 ; C110.1@163.906,5.468 v1@164.455,5.468 ; C110.1@163.906,6.549 v1@164.455,6.549 ; C121.1@163.906,7.568 v1@164.455,7.568 ; C121.1@163.906,8.649 v1@164.455,8.649 ; v1@165.258,5.468 C123.1@165.807,5.468 ; v1@165.258,6.549 C123.1@165.807,6.549
  L1 w0.4: IC13.4@75.5,94.525 v1@76.75,94.525 ; v1(169.71,11.3) IC12.7@169.71,12.448 ; v1(176.809,11.3) IC16.7@176.809,12.448 ; v1(183.908,11.283) IC17.7@183.908,12.431 ; v1(185.208,11.283) IC17.5@185.208,12.431 ; v1(185.858,11.283) IC17.4@185.858,12.431 ; v1(186.508,11.283) IC17.3@186.508,12.431
  L1 w0.508: v1@76.75,94.525 v1(76.76,94.536) ; R91.1@83.3,95.3 R91.1@83.386,95.214 ; R91.1@83.482,95.1 v4@84.182,95.1 ; C47.1@83.482,96.6 v4@84.182,96.6 ; v4@84.182,95.091 v4@84.2,95.109 ; v4@84.182,96.591 v4@84.2,96.609 ; R90.1@86.6,95.1 R90.1@86.75,95.25 ; R92.1@86.75,96.55 R92.1@86.9,96.7 ; R90.1@86.782,95.1 v4@87.482,95.1 ; R92.1@86.782,96.6 v4@87.482,96.6 ; v4@87.482,95.091 v4@87.5,95.109 ; v4@87.482,96.591 v4@87.5,96.609 ; LD2A.1@137,27 v1(138,27) ; LD3A.1@137,28.5 v1(138,28.5) ; LD5A.1@137,30 v1(138,30) ; LD7A.1@137,33 v1(138,33) ; LD8A.1@137,34.5 v1(138,34.5) ; LD9A.1@137,36 v1(138,36) ; LD12A.1@137,37.5 v1(138,37.5) 138.054,37.446 138.879,37.446 139.1,37.225 C21B.1@139.1,37.2 ; LD13A.1@137,39.05 137.096,39.146 137.587,39.146 v1(137.745,39.305) ; LD14A.1@137,40.55 137.15,40.7 v1(137.9,40.7) ; LD15A.1@137,42.05 v1(137.75,42.05) ; LD17A.1@137,45.05 v1(138,45.05) ; LD18A.1@137,46.55 v1(138,46.55) ; LD19A.1@137,48.05 v1(138,48.05) ; LD20A.1@137,49.55 v1(138,49.55) 138.15,49.4 C21A.1@139.1,49.4 ; LD21A.1@137,51.05 v1(138,51.05) ; LD22A.1@137,52.55 v1(138,52.55) ; LD23A.1@137,54.05 v1(138,54.05) ; LD25A.1@137,57.05 v1(138,57.05) ; LD26A.1@137,58.55 v1(138,58.55) ; LD27A.1@137,60.05 v1(138,60.05) ; LD28A.1@137,61.55 v1(138,61.55) 138.15,61.4 C20B.1@139.1,61.4 ; LD29A.1@137,63.05 v1(138,63.05) ; LD30A.1@137,64.55 137.997,64.55 v1(138,64.547) ; LD31A.1@137,66.05 v1(138,66.05) ; LD33A.1@137,69.05 v1(138,69.05) ; LD34A.1@137,70.55 v1(138,70.55) ; LD35A.1@137,72.05 v1(138,72.05) ; LD36A.1@137,73.55 v1(138,73.55) 138.05,73.6 C19B.1@139.2,73.6 ; LD6A.1@137.025,31.55 v1(138.025,31.55) ; LD16A.1@137.025,43.6 v1(138.025,43.6) ; LD24A.1@137.025,55.6 v1(138.025,55.6) ; LD32A.1@137.025,67.6 v1(138.025,67.6) ; C11.1@143.4,4.3 R117.1@143.4,5.8 ; IC10A.8@144.45,28.8 144.479,28.771 144.479,27.771 v1(144.5,27.75) ; IC7A.8@144.45,52.85 144.479,52.821 144.479,51.821 v1(144.5,51.8) ; IC9A.8@144.45,64.85 144.479,64.821 144.479,63.821 v1(144.5,63.8) ; IC11A.8@144.479,40.379 144.479,39.821 v1(144.5,39.8) ; v2(148.8,78.667) LD4.1@150.575,78.667 ; v2(148.8,81.1) LD37.1@150.575,81.1 ; v2(148.8,83.5) LD11.1@150.575,83.5 ; v2(148.8,85.967) LD38.1@150.575,85.967 ; LD2B.1@156.575,27.05 v1(157.575,27.05) ; LD3B.1@156.575,28.55 v1(157.575,28.55) ; LD5B.1@156.575,30.05 v1(157.575,30.05) ; LD7B.1@156.575,33.05 v1(157.575,33.05) ; LD8B.1@156.575,34.55 v1(157.575,34.55) ; LD9B.1@156.575,36.05 v1(157.575,36.05) ; LD12B.1@156.575,37.55 v1(157.575,37.55) 158.35,37.55 C20A.1@158.5,37.4 ; LD13B.1@156.575,39.1 156.671,39.196 157.028,39.196 v1(157.253,39.422) ; LD14B.1@156.575,40.6 v1(157.5,40.6) ; LD15B.1@156.575,42.1 v1(157.575,42.1) ; LD17B.1@156.575,45.1 v1(157.575,45.1) ; LD18B.1@156.575,46.6 v1(157.575,46.6) ; LD19B.1@156.575,48.1 v1(157.575,48.1) ; LD20B.1@156.575,49.6 v1(157.575,49.6) 158.4,49.6 C19A.1@158.6,49.8 ; LD21B.1@156.575,51.1 v1(157.575,51.1) ; LD22B.1@156.575,52.6 v1(157.575,52.6) ; LD23B.1@156.575,54.1 v1(157.575,54.1) ; LD25B.1@156.575,57.1 v1(157.575,57.1) ; LD26B.1@156.575,58.6 v1(157.575,58.6) ; LD27B.1@156.575,60.1 v1(157.575,60.1) ; LD28B.1@156.575,61.6 v1(157.575,61.6) 158.5,61.6 C18B.1@158.6,61.5 ; LD29B.1@156.575,63.1 v1(157.575,63.1) ; LD30B.1@156.575,64.6 v1(157.575,64.6) ; LD31B.1@156.575,66.1 v1(157.575,66.1) ; LD33B.1@156.575,69.1 v1(157.575,69.1) ; LD34B.1@156.575,70.6 v1(157.575,70.6) ; LD35B.1@156.575,72.1 v1(157.575,72.1) ; LD36B.1@156.575,73.6 v1(157.575,73.6) 158.4,73.6 C18A.1@158.5,73.5 ; LD6B.1@156.6,31.6 v1(157.6,31.6) ; LD16B.1@156.6,43.65 v1(157.6,43.65) ; LD24B.1@156.6,55.65 v1(157.6,55.65) ; LD32B.1@156.6,67.65 v1(157.6,67.65) ; TP16.1@157.6,88.4 v2(157.6,89.6) ; IC10B.8@164.025,28.85 164.054,28.821 164.054,27.821 v1(164.075,27.8) ; IC7B.8@164.025,52.9 164.054,52.871 164.054,51.871 v1(164.075,51.85) ; IC9B.8@164.025,64.9 164.054,64.871 164.054,63.871 v1(164.075,63.85) ; IC11B.8@164.054,40.429 164.054,39.871 v1(164.075,39.85) ; v1(165.223,7.793) C93.1@166.138,7.793 C123.1@166.138,6.144 ; C123.1@165.882,6.165 C123.1@166.038,6.008 ; C93.1@165.988,7.833 IC22.1@165.988,9.482 ; R56.1@167.642,15.678 R56.1@167.838,15.482 ; R56.1@167.838,15.532 v1(167.838,16.447) ; IC1.8@170.55,65.805 170.555,65.8 v1@171.795,65.8 ; IC1.6@170.55,68.345 170.595,68.3 v1@171.835,68.3 ; IC1.7@170.575,67.1 IC1.7@170.55,67.075 v1@171.79,67.075 ; v1@171.79,67.07 v1@171.8,67.08 ; v1@171.795,65.795 v1@171.805,65.805 ; v1@171.835,68.295 v1@171.845,68.305 ; C4.1@175.2,8.05 v1(175.2,8.965) ; v1(175.302,37.66) TP17.1@176.102,37.66 ; v1(176.994,16.498) T2.2@177.909,16.498 ; TP17.1@177,37.66 v1(177.8,37.66) ; v1(177.218,70.682) R95.1@178.032,70.682 ; v1(177.218,73.782) C2.1@178.032,73.782 ; T4.2@177.249,18.975 v1(178.049,18.975) ; T3.2@177.299,22.95 v1(178.099,22.95) ; T2.2@177.959,16.498 179.252,16.498 179.45,16.3 R104.1@179.5,16.3 ; R95.1@178.232,70.682 R95.1@178.25,70.7 ; v1(178.851,26.545) C26.1@179.851,26.545 ; v1(178.851,30.355) C27.1@179.851,30.355 ; v1(178.851,32.355) C38.1@179.851,32.355 ; v1(178.863,27.986) C25.1@179.763,27.986 ; v1(178.863,28.885) C25.1@179.763,28.885 ; v1(179.101,57.595) C8.1@179.901,57.595 ; v1(179.101,38.66) C58.1@179.901,38.66 ; v1(179.101,44.97) C10.1@179.901,44.97 ; v1(179.101,55.1) C1.1@179.901,55.1 ; C27.1@179.851,30.305 C27.1@179.951,30.405 ; IC8.8@180.05,65.805 v1@181.29,65.805 ; IC8.7@180.075,67.1 IC8.7@180.05,67.075 v1@181.29,67.075 ; IC8.6@180.095,68.3 IC8.6@180.05,68.345 v1@181.29,68.345 ; v1@181.29,65.8 v1@181.3,65.81 ; v1@181.29,67.07 v1@181.3,67.08 ; v1@181.29,68.34 v1@181.3,68.35 ; C22.1@182.299,8.05 v1(182.299,8.965) ; v1(182.8,64.2) R96.1@183.6,64.2 ; IC5.5@183.3,42.521 183.346,42.475 IC5.5@183.351,42.475 ; IC4.5@183.351,48.785 IC4.5@183.364,48.772 ; IC3.3@183.351,52.555 IC3.3@183.361,52.564 ; IC2.5@183.351,61.405 183.354,61.402 184.699,61.402 v2(184.701,61.4) ; IC5.5@183.354,42.472 184.699,42.472 v2(184.701,42.47) ; IC3.4@183.354,51.282 184.699,51.282 v2(184.701,51.28) ; IC3.3@183.363,52.562 184.708,52.562 v2(184.711,52.559) ; IC4.5@183.366,48.769 184.711,48.769 v2(184.714,48.767) ; v1(185.15,18.185) D7.1@185.15,19.1 ; IC32.2@186.05,35.461 v1(186.05,36.461) ; v1(187.25,72.05) C9.1@187.25,72.85 ; v2(187.401,26.54) 187.403,26.543 IC18.1@188.748,26.543 ; v1@187.8,66.445 v1@187.81,66.435 ; v1@187.81,66.44 IC6.7@189.05,66.44 ; IC15.4@188.751,36.165 188.805,36.165 IC15.4@188.851,36.211 ; IC15.4@188.754,36.162 190.098,36.162 v2(190.101,36.16) ; v1(189.25,18.185) D6.1@189.25,19.1 ; C24.1@189.35,8 v1(189.35,8.915) ; v1(190.401,29.25) T1.2@191.201,29.25 ; v1(192.701,22.95) D5.1@193.501,22.95 ; v1(192.701,35.05) D1.1@193.501,35.05 ; v1(193.402,6.79) D10.2@193.402,7.705 ; R69.1@193.5,96.35 R69.1@193.5,96.4 ; v1(193.55,18.185) D4.1@193.55,19.1 ; R69.1@193.612,96.6 v1(193.612,97.4) ; v1(194.2,6.785) D10.2@194.2,7.7 ; IC14.2@194.2,12.2 194.246,12.154 194.246,11.379 195,10.625 C40.1@195,10.6 v1(195.915,10.6) ; IC6.9@194.45,67.71 v1@195.69,67.71 ; IC6.10@194.45,68.98 IC6.10@194.47,69 ; IC6.12@194.45,71.52 v1@195.78,71.52 ; IC6.13@194.45,72.79 C3.1@196.25,72.79 ; IC6.10@194.47,68.98 v1(195.7,68.98) ; v1(194.998,6.79) D10.2@194.998,7.705 ; v1@195.69,67.715 v1@195.7,67.705 ; v1@195.78,71.53 v1@195.8,71.51 ; C23.2@195.812,16.337 v1(196.727,16.337) ; C23.2@195.812,17.063 v1(196.727,17.063) ; C3.1@196.25,72.65 v1(197.05,72.65) ; C7.1@196.6,96.375 C7.1@196.6,96.4 ; C7.1@196.75,96.6 v1(196.75,97.4) ; C5.1@201.375,96.6 v1(201.375,97.4) ; R70.1@206.062,96.6 v1(206.062,97.4) ; R71.1@207.575,96.6 v1(207.575,97.4) ; C6.1@210.712,96.6 v1(210.712,97.4)
  L6 w0.4: J9.2@7.96,81.64 8.42,81.64 9.18,82.4 R94.1@10.5,82.4 11.82,82.4 12.58,81.64 J9.2@13.04,81.64 ; J12.2@7.96,84.86 8.42,84.86 9.18,84.1 R100.1@10.5,84.1 11.82,84.1 12.58,84.86 J12.2@13.04,84.86 ; Q1A.4@22.877,9.634 22.877,8.76 23.106,8.531 24.831,8.531 25.2,8.9 25.2,9.4 25.627,9.827 Q1C.4@43.713,9.827 ; Q1E.4@22.877,20.826 22.877,19.952 23.106,19.723 24.831,19.723 25.2,20.092 25.2,20.592 25.627,21.019 Q1G.4@43.713,21.019 ; Q1I.4@22.877,32.018 22.877,31.144 23.106,30.915 24.831,30.915 25.2,31.284 25.2,31.784 25.627,32.211 Q1K.4@43.713,32.211 ; Q1M.4@22.877,43.21 22.877,42.336 23.106,42.107 24.831,42.107 25.2,42.476 25.2,42.976 25.627,43.403 Q1O.4@43.713,43.403 ; Q1Q.4@22.877,54.402 22.877,53.528 23.106,53.299 24.831,53.299 25.2,53.668 25.2,54.168 25.627,54.595 Q1S.4@43.713,54.595 ; Q1U.4@22.877,65.594 22.877,64.72 23.106,64.491 24.831,64.491 25.2,64.86 25.2,65.36 25.627,65.787 Q1W.4@43.713,65.787 ; Q1Y.4@22.877,76.786 22.877,75.912 23.106,75.683 24.831,75.683 25.2,76.052 25.2,76.552 25.627,76.979 Q1AA.4@43.713,76.979 ; Q1AC.4@22.877,87.978 22.877,87.104 23.106,86.875 24.831,86.875 25.2,87.244 25.2,87.744 25.627,88.171 Q1AE.4@43.713,88.171 ; Q1A.1@24.177,7.434 24.177,8.531 ; Q1E.1@24.177,18.626 24.177,19.723 ; Q1I.1@24.177,29.818 24.177,30.915 ; Q1M.1@24.177,41.01 24.177,42.107 ; Q1Q.1@24.177,52.202 24.177,53.299 ; Q1U.1@24.177,63.394 24.177,64.491 ; Q1Y.1@24.177,74.586 24.177,75.683 ; Q1AC.1@24.177,85.778 24.177,86.875 ; Q1C.4@43.713,9.634 43.713,8.76 43.942,8.531 45.667,8.531 46.036,8.9 46.036,9.4 46.463,9.827 Q1B.4@64.549,9.827 ; Q1G.4@43.713,20.826 43.713,19.952 43.942,19.723 45.667,19.723 46.036,20.092 46.036,20.592 46.463,21.019 Q1F.4@64.549,21.019 ; Q1K.4@43.713,32.018 43.713,31.144 43.942,30.915 45.667,30.915 46.036,31.284 46.036,31.784 46.463,32.211 Q1J.4@64.549,32.211 ; Q1O.4@43.713,43.21 43.713,42.336 43.942,42.107 45.667,42.107 46.036,42.476 46.036,42.976 46.463,43.403 Q1N.4@64.549,43.403 ; Q1S.4@43.713,54.402 43.713,53.528 43.942,53.299 45.667,53.299 46.036,53.668 46.036,54.168 46.463,54.595 Q1R.4@64.549,54.595 ; Q1W.4@43.713,65.594 43.713,64.72 43.942,64.491 45.667,64.491 46.036,64.86 46.036,65.36 46.463,65.787 Q1V.4@64.549,65.787 ; Q1AA.4@43.713,76.786 43.713,75.912 43.942,75.683 45.667,75.683 46.036,76.052 46.036,76.552 46.463,76.979 Q1Z.4@64.549,76.979 ; Q1AE.4@43.713,87.978 43.713,87.104 43.942,86.875 45.667,86.875 46.036,87.244 46.036,87.744 46.463,88.171 Q1AD.4@64.549,88.171 ; Q1C.1@45.013,7.434 45.013,8.531 ; Q1G.1@45.013,18.626 45.013,19.723 ; Q1K.1@45.013,29.818 45.013,30.915 ; Q1O.1@45.013,41.01 45.013,42.107 ; Q1S.1@45.013,52.202 45.013,53.299 ; Q1W.1@45.013,63.394 45.013,64.491 ; Q1AA.1@45.013,74.586 45.013,75.683 ; Q1AE.1@45.013,85.778 45.013,86.875 ; Q1B.4@64.549,9.634 64.549,8.76 64.778,8.531 66.503,8.531 66.872,8.9 66.872,9.4 67.299,9.827 Q1D.4@85.385,9.827 ; Q1F.4@64.549,20.826 64.549,19.952 64.778,19.723 66.503,19.723 66.872,20.092 66.872,20.592 67.299,21.019 Q1H.4@85.385,21.019 ; Q1J.4@64.549,32.018 64.549,31.144 64.778,30.915 66.503,30.915 66.872,31.284 66.872,31.784 67.299,32.211 Q1L.4@85.385,32.211 ; Q1N.4@64.549,43.21 64.549,42.336 64.778,42.107 66.503,42.107 66.872,42.476 66.872,42.976 67.299,43.403 Q1P.4@85.385,43.403 ; Q1R.4@64.549,54.402 64.549,53.528 64.778,53.299 66.503,53.299 66.872,53.668 66.872,54.168 67.299,54.595 Q1T.4@85.385,54.595 ; Q1V.4@64.549,65.594 64.549,64.72 64.778,64.491 66.503,64.491 66.872,64.86 66.872,65.36 67.299,65.787 Q1X.4@85.385,65.787 ; Q1Z.4@64.549,76.786 64.549,75.912 64.778,75.683 66.503,75.683 66.872,76.052 66.872,76.552 67.299,76.979 Q1AB.4@85.385,76.979 ; Q1AD.4@64.549,87.978 64.549,87.104 64.778,86.875 66.503,86.875 66.872,87.244 66.872,87.744 67.299,88.171 Q1AF.4@85.385,88.171 ; Q1B.1@65.849,7.434 65.849,8.531 ; Q1F.1@65.849,18.626 65.849,19.723 ; Q1J.1@65.849,29.818 65.849,30.915 ; Q1N.1@65.849,41.01 65.849,42.107 ; Q1R.1@65.849,52.202 65.849,53.299 ; Q1V.1@65.849,63.394 65.849,64.491 ; Q1Z.1@65.849,74.586 65.849,75.683 ; Q1AD.1@65.849,85.778 65.849,86.875 ; Q1D.4@85.385,9.634 85.385,8.76 85.614,8.531 87.339,8.531 87.708,8.9 87.708,9.4 88.135,9.827 102.3,9.827 ; Q1H.4@85.385,20.826 85.385,19.952 85.614,19.723 87.339,19.723 87.708,20.092 87.708,20.592 88.135,21.019 102.3,21.019 ; Q1L.4@85.385,32.018 85.385,31.144 85.614,30.915 87.339,30.915 87.708,31.284 87.708,31.784 88.224,32.3 102.3,32.3 ; Q1P.4@85.385,43.21 85.385,42.336 85.614,42.107 87.339,42.107 87.708,42.476 87.708,42.976 88.132,43.4 102.3,43.4 ; Q1T.4@85.385,54.402 85.385,53.528 85.614,53.299 87.339,53.299 87.708,53.668 87.708,54.168 88.135,54.595 102.3,54.595 ; Q1X.4@85.385,65.594 85.385,64.72 85.614,64.491 87.339,64.491 87.708,64.86 87.708,65.36 88.135,65.787 102.3,65.787 ; Q1AB.4@85.385,76.786 85.385,75.912 85.614,75.683 87.339,75.683 87.708,76.052 87.708,76.552 88.135,76.979 102.3,76.979 ; Q1AF.4@85.385,87.978 85.385,87.104 85.614,86.875 87.339,86.875 87.708,87.244 87.708,87.744 88.135,88.171 101.029,88.171 102.3,86.9 102.3,76.979 ; Q1D.1@86.685,7.434 86.685,8.531 ; Q1H.1@86.685,18.626 86.685,19.723 ; Q1L.1@86.685,29.818 86.685,30.915 ; Q1P.1@86.685,41.01 86.685,42.107 ; Q1T.1@86.685,52.202 86.685,53.299 ; Q1X.1@86.685,63.394 86.685,64.491 ; Q1AB.1@86.685,74.586 86.685,75.683 ; Q1AF.1@86.685,85.778 86.685,86.875 ; 101.029,88.108 103.208,88.108 106.6,91.5 125.5,91.5 127.2,89.8 ; 102.3,51.788 134.9,51.788 ; 127.9,12.2 125.4,9.7 102.3,9.7 102.3,9.827 ; 102.3,9.827 102.3,21.019 ; 102.3,21.019 102.3,32.3 ; 102.3,32.3 102.3,43.4 ; 102.3,43.4 102.3,54.595 ; 102.3,54.595 102.3,65.787 ; 102.3,65.787 102.3,76.979
  L6 w0.508: LD1.1@-1,70.35 v1(-1,71.8) ; R119.2@112.096,3.643 v1(112.918,3.643)
  other v1: 140.985,3.86 10.115,4.06 140.985,4.94 10.115,5.14 164.49,5.468 165.223,5.468 155.39,6.16 164.49,6.549 165.223,6.549 140.985,7.16 155.39,7.24 164.49,7.568 155.39,8.06 7.4,8.234 140.985,8.24 164.49,8.649 155.39,9.14 137.715,9.56 154.914,10.35 137.715,10.64 137.715,11.66 18.5,12.3 137.715,12.74 35.4,13.216 56.236,13.216 77.072,13.216 97.908,13.216 26.7,13.316 47.536,13.316 68.372,13.316 89.208,13.316 22.2,13.416 43.036,13.416 63.872,13.416 84.708,13.416 38.002,13.616 58.838,13.616 79.674,13.616 35.4,14.576 38.002,14.576 40.604,14.576 56.236,14.576 58.838,14.576 61.44,14.576 77.072,14.576 79.674,14.576 82.276,14.576 97.908,14.576 28.7,14.616 49.536,14.616 70.372,14.616 91.208,14.616 148.42,14.698 151.224,15.095 153.384,16.4 209.715,17.166 211.192,17.168 219.3,17.8 213.608,19.307 216.4,19.317 217.727,19.317 207.001,20.497 208.394,20.497 212.2,20.6 216.375,20.719 217.734,20.734 214.77,23.253 18.5,23.492 208.4,24.1 35.4,24.408 56.236,24.408 77.072,24.408 97.908,24.408 26.7,24.508 47.536,24.508 68.372,24.508 89.208,24.508 22.2,24.608 43.036,24.608 63.872,24.608 84.708,24.608 213.3,24.6 38.002,24.808 58.838,24.808 79.674,24.808 209.655,25.498 207.7,25.7 35.4,25.768 38.002,25.768 40.604,25.768 56.236,25.768 58.838,25.768 61.44,25.768 77.072,25.768 79.674,25.768 82.276,25.768 97.908,25.768 28.7,25.808 49.536,25.808 70.372,25.808 91.208,25.808 184.8,25.9 144.6,26 210.7,26.5 160.7,26.6 164.1,26.7 209.037,27.191 164.1,30.3 145.8,30.447 145.9,32.1 18.5,34.684 35.4,35.6 56.236,35.6 77.072,35.6 97.908,35.6 26.7,35.7 47.536,35.7 68.372,35.7 89.208,35.7 22.2,35.8 43.036,35.8 63.872,35.8 84.708,35.8 38.002,36 58.838,36 79.674,36 146,36.2 35.4,36.96 38.002,36.96 40.604,36.96 56.236,36.96 58.838,36.96 61.44,36.96 77.072,36.96 79.674,36.96 82.276,36.96 97.908,36.96 28.7,37 49.536,37 70.372,37 91.208,37 146,37.5 203.4,37.8 160.6,38.9 146,40 146,41.7 18.5,45.876 203.3,46 146.3,46.6 35.4,46.792 56.236,46.792 77.072,46.792 97.908,46.792 26.7,46.892 47.536,46.892 68.372,46.892 89.208,46.892 22.2,46.992 43.036,46.992 63.872,46.992 84.708,46.992 38.002,47.192 58.838,47.192 79.674,47.192 35.4,48.152 38.002,48.152 40.604,48.152 56.236,48.152 58.838,48.152 61.44,48.152 77.072,48.152 79.674,48.152 82.276,48.152 97.908,48.152 28.7,48.192 49.536,48.192 70.372,48.192 91.208,48.192 146.2,48.3 160.4,48.8 164.2,49.3 146.2,49.6 160.6,50.7 146.2,52.2 146.3,55.4 18.5,57.068 146.2,57.8 35.4,57.984 56.236,57.984 77.072,57.984 97.908,57.984 26.7,58.084 47.536,58.084 68.372,58.084 89.208,58.084 22.2,58.184 43.036,58.184 63.872,58.184 84.708,58.184 38.002,58.384 58.838,58.384 79.674,58.384 35.4,59.344 38.002,59.344 40.604,59.344 56.236,59.344 58.838,59.344 61.44,59.344 77.072,59.344 79.674,59.344 82.276,59.344 97.908,59.344 28.7,59.384 49.536,59.384 70.372,59.384 91.208,59.384 160.5,62.4 146,63.8 146,65.7 171.805,65.8 181.3,65.805 187.8,66.44 171.8,67.075 181.3,67.075 146,67.2 195.7,67.71 18.5,68.26 171.845,68.3 181.3,68.345 146.1,68.8 35.4,69.176 56.236,69.176 77.072,69.176 97.908,69.176 26.7,69.276 47.536,69.276 68.372,69.276 89.208,69.276 22.2,69.376 43.036,69.376 63.872,69.376 84.708,69.376 38.002,69.576 58.838,69.576 79.674,69.576 35.4,70.536 38.002,70.536 40.604,70.536 56.236,70.536 58.838,70.536 61.44,70.536 77.072,70.536 79.674,70.536 82.276,70.536 97.908,70.536 28.7,70.576 49.536,70.576 70.372,70.576 91.208,70.576 146.1,70.9 195.8,71.52 160.4,71.9 146.1,72.2 18.5,79.452 35.4,80.368 56.236,80.368 77.072,80.368 97.908,80.368 26.7,80.468 47.536,80.468 68.372,80.468 89.208,80.468 22.2,80.568 43.036,80.568 63.872,80.568 84.708,80.568 38.002,80.768 58.838,80.768 79.674,80.768 35.4,81.728 38.002,81.728 40.604,81.728 56.236,81.728 58.838,81.728 61.44,81.728 77.072,81.728 79.674,81.728 82.276,81.728 97.908,81.728 28.7,81.768 49.536,81.768 70.372,81.768 91.208,81.768 170.4,90.3 18.5,90.644 35.4,91.56 56.236,91.56 77.072,91.56 97.908,91.56 26.7,91.66 47.536,91.66 68.372,91.66 89.208,91.66 22.2,91.76 43.036,91.76 63.872,91.76 82.168,91.76 84.708,91.76 195.7,91.9 38.002,91.96 58.838,91.96 79.674,91.96 35.4,92.92 38.002,92.92 40.604,92.92 56.236,92.92 58.838,92.92 61.44,92.92 77.072,92.92 97.908,92.92 28.7,92.96 49.536,92.96 70.372,92.96 91.208,92.96 219.1,97.1
  other v3: 148.44,11.796 150.1,11.796 149.27,12.25 148.44,12.704 150.1,12.704
  other v4: 84.2,95.1 87.5,95.1 84.2,96.6 87.5,96.6
I2C0_SCL: D1.3 IC12.9 IC12.10 IC13.2 IC15.6 IC16.9 IC16.10 IC32.1 J6.27 R177.1 TP2.1 | length 246.1
  L1 w0.127: R177.1@73.6,95 73.6,95.05 74.375,95.825 75.35,95.825 75.425,95.9 IC13.2@75.5,95.825 77.196,95.825 78.012,95.009 78.012,94.292 78.491,93.813 87.725,93.813 90.491,96.58 169.02,96.58 169.5,96.1 v1(170.7,96.1) ; v1@168.842,35.358 168.842,18.642 168.644,18.444 168.644,6.256 169.435,5.465 170.56,5.465 ; IC12.9@170.36,6.665 IC12.9@170.36,6.648 170.36,5.665 170.56,5.465 ; IC12.10@171.01,6.665 IC12.10@171.01,6.648 171.01,5.465 ; v1(171.848,64.1) 171.848,35.448 v1(171.8,35.4) 173.94,33.26 TP2.1@176.551,33.26 177.56,33.26 179.195,34.895 IC15.6@183.351,34.895 183.546,34.7 186.9,34.7 187,34.8 IC32.1@187,35.561 187,36.5 187.25,36.75 D1.3@191.25,36.75 192.05,36.75 192.8,36 195.532,36 197.211,34.321 197.211,29.089 J6.27@199.21,27.09 ; IC16.9@177.459,6.648 177.459,5.465 ; IC16.10@178.109,6.648 178.109,5.648 177.926,5.465 177.459,5.465 ; 170.56,5.465 171.01,5.465 ; 171.01,5.465 177.459,5.465
  L3 w0.127: v1(168.842,35.4) v1(171.8,35.4) ; v1(170.7,96.1) 170.7,90.922 170.887,90.735 170.887,89.739 170.7,89.551 170.7,65.248 v1(171.848,64.1)